# Altium PCB Flight_Computer_2_GE.PcbDoc (part 2 of 5)
Units mil, origin at the board's own origin, x right, y up, seen from the top; angles counter-clockwise.
Board outline 4000 x 3000 mil, 4 copper layers (Top Layer, GND, 3.3V, Bottom Layer), stack 62.449 mil thick; 220 components, 150 nets, 776 pads, 444 vias.
Unrouted connection lines stored in the file: 107.
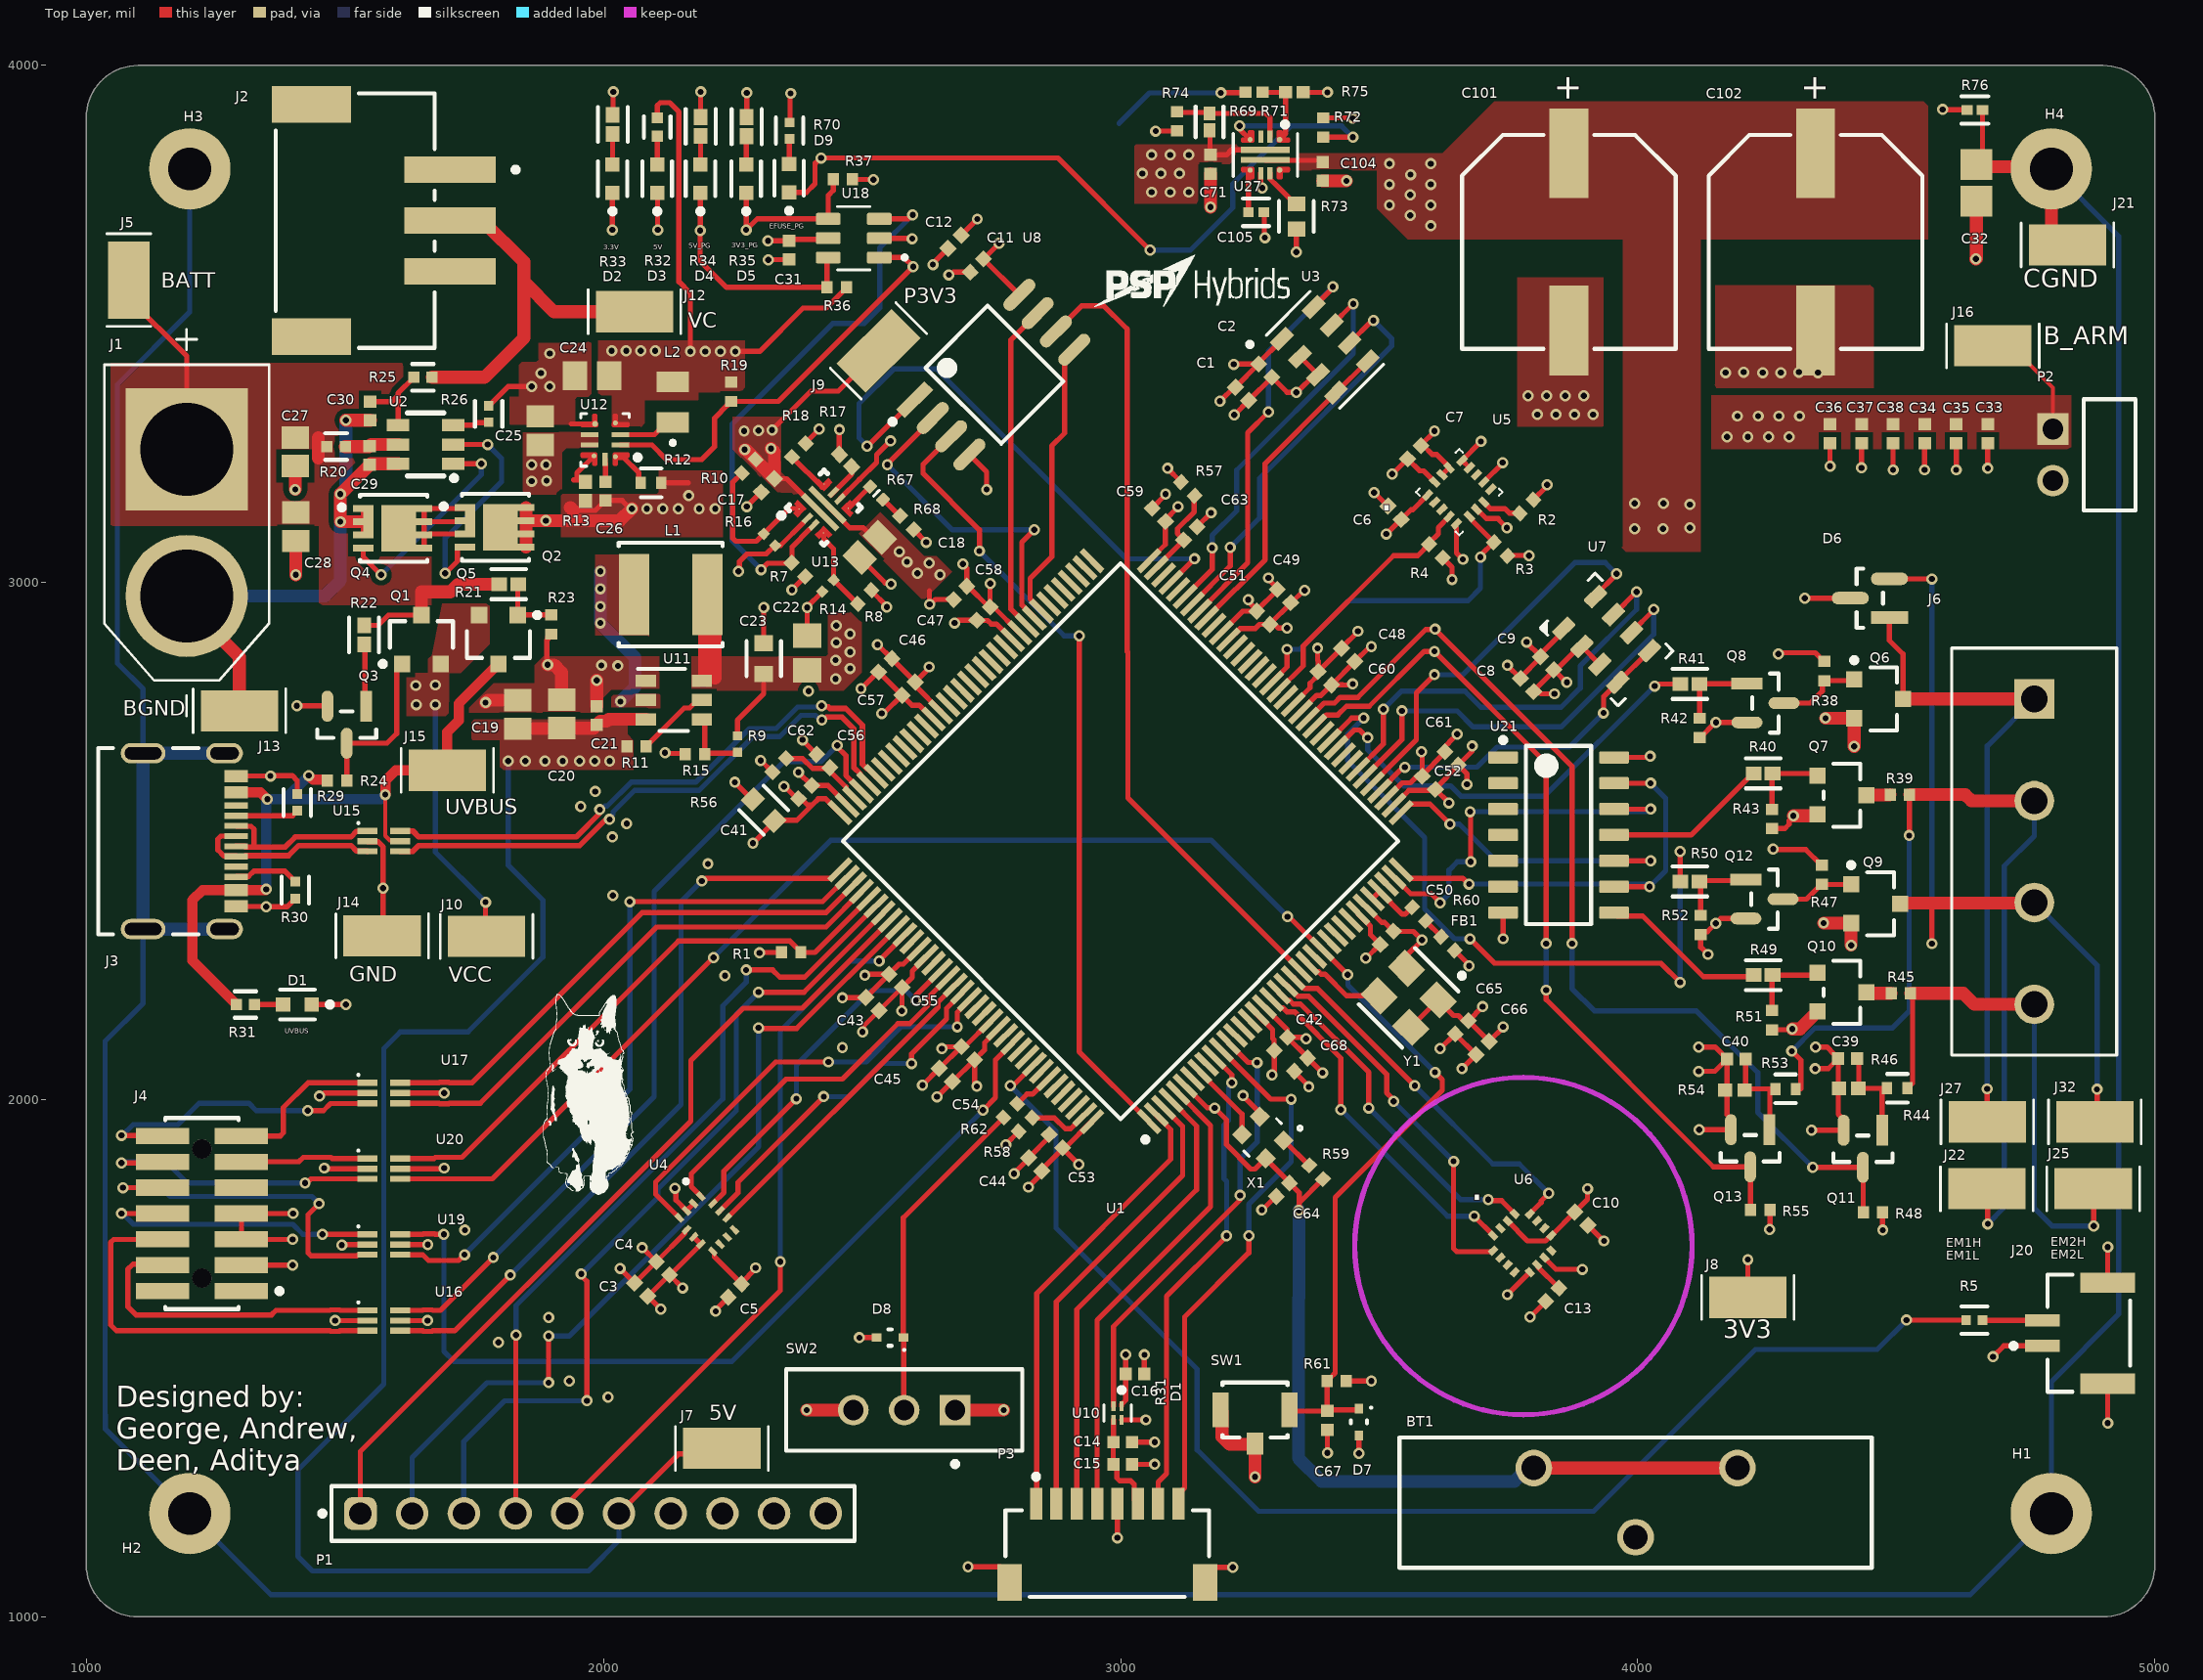
[diagram p0: Top Layer view]

## Part data (continued)
C23: library part CMP-03422-001204-1, "CAP CER 4.7UF 25V X5R 0603", Capacitance="4.7 uF", Manufacturer=YAGEO, Package=CC0603-DA, Temperature="-55°C to +125°C", Temperature Characteristic=X5R, Temperature Coefficient=15%, Temperature Range High=+125°C, Temperature Range Low=-55°C, Tolerance=0.2, Voltage="25 V", Automotive=No, Category=Cap, ComponentLink2Description=Datasheet, ComponentLink2URL=http://www.yageo.com/documents/recent/UPY-GPHC_X7R_6.3V-to-50V_18.pdf, Device Class L1="Passive Components", Device Class L2=Capacitors, Device Class L3="Ceramic Capacitors", Digikey Description="CAP CER 4.7UF 25V X5R 0603", Footprint Url=http://www.yageo.com/exep/pages/download/literatures/UPY-C_GEN_24.pdf, Height=0.9mm, Lead Free=Yes, Manufacturer Part Number=CC0603MRX5R8BB475, Material=Ceramic, Octopart=https://octopart.com/cc0603mrx5r8bb475-yageo-81932637, RoHS=TRUE, Voltage Rating="25 V"
C24: library part CMP-001-00007-7, Capacitor Type=Ceramic, Case/Package=0805, Max Operating Temperature=125°C, Min Operating Temperature=-55°C, Tolerance=10%, Voltage Rating=50V, Mounting Technology=SM, Pins=2, RoHS Compliant=True
C26: library part C_3.3nF_0402, "CAP CER 3300PF (3.3nF) 10V X7R 0402", Case Code (Imperial)=0402, Case Code (Metric)=1005, Dielectric=X7R, Dielectric Material=Ceramic, LCSC Part #=C20793063, Manufacturer="Samsung Electro-Mechanics", Manufacturer Part Number=CL05B332KA5VPNC, Max Operating Temperature=125°C, Min Operating Temperature=-55°C, Supplier Part Number=1276-CL05B332KA5VPNCCT-ND, Tolerance=10%, Voltage Rating=25V, Case/Package=0402, Category="Ceramic Capacitors", China RoHS=Compliant, ComponentLink1Description=https://datasheet.octopart.com:443/CL05B332KA5VPNC-Samsung-Electro-Mechanics-datasheet-176142735.pdf?src-supplier=IHS, ComponentLink1URL=https://datasheet.octopart.com:443/CL05B332KA5VPNC-Samsung-Electro-Mechanics-datasheet-176142735.pdf?src-supplier=IHS, ComponentLink2Description=https://datasheet.octopart.com:443/C0402C332M8RACTU-KEMET-datasheet-178445679.pdf?src-supplier=IHS, ComponentLink2URL=https://datasheet.octopart.com:443/C0402C332M8RACTU-KEMET-datasheet-178445679.pdf?src-supplier=IHS, ComponentLink3Description=https://datasheet.octopart.com:443/C0402C332M8RACTU-KEMET-datasheet-137357759.pdf?src-supplier=Upverter, ComponentLink3URL=https://datasheet.octopart.com:443/C0402C332M8RACTU-KEMET-datasheet-137357759.pdf?src-supplier=Upverter, ComponentLink4Description=https://datasheet.octopart.com:443/C0402C332M8RACTU-KEMET-datasheet-157246124.pdf?src-supplier=Electro+Sonic, ComponentLink4URL=https://datasheet.octopart.com:443/C0402C332M8RACTU-KEMET-datasheet-157246124.pdf?src-supplier=Electro+Sonic, ComponentLink5Description=https://datasheet.octopart.com/C0402C332M8RACTU-KEMET-datasheet-84169754.pdf, ComponentLink5URL=https://datasheet.octopart.com/C0402C332M8RACTU-KEMET-datasheet-84169754.pdf, Height=500µm, Length=1mm, Lifecycle Status=Production, Material=Ceramic, Mounting Technology="Surface Mount", Number of Terminals=2, Pins=2, Pricing="1=0.1, 10=0.034, 50=0.0226, 100=0.0193, 500=0.0138, 1000=0.01212, 2500=0.01034, 5000=0.00928 (USD)", REACH SVHC=Yes, RoHS=Compliant, Stock=24876, Supplier=DigiKey, Termination=SMD/SMT, Voltage Rating (DC)=25V, Weight=652.039032µg, Width=500µm
C32: library part CMP-2007-01230-1, "0805 1nF 1000V", Manufacturer=Kemet, Part Number=C0805C102JDRACTU
C33: library part CMP-001-00091-2, Capacitor Type=Ceramic, Case/Package=0402, LCSC Part Number=C307413, Manufacturer=Samsung, Manufacturer Part Number=CL05A105KL5NRNC, Max Operating Temperature=85°C, Min Operating Temperature=-55°C, Package Height=0.32mm, Package Length=1mm, Package Shape=Rectangular, Package Style=SMTMeter, Package Width=0.5mm, Power=62.5mW, Rated DC Voltage (URdc)=35V, Rated Temperature=70°C, Resistor Type="FIXED RESISTOR", Temperature Characteristics Code=X5R, Temperature Coefficient=100ppm/°C, Tolerance=1%, Tolerance  (fill in as +-)=10%, Working Voltage=50V, Additional Feature="LASER TRIMMABLE", Category="Ceramic Capacitors", Component Type=Standard, ComponentLink1Description=https://datasheet.ciiva.com:443/pdfs/VipMasterIC/IC/SEMS/SEMS-S-A0008384515/SEMS-S-A0008872905-1.pdf?src-supplier=IHS+Markit, ComponentLink1URL=https://datasheet.ciiva.com:443/pdfs/VipMasterIC/IC/SEMS/SEMS-S-A0008384515/SEMS-S-A0008872905-1.pdf?src-supplier=IHS+Markit, ComponentLink2Description=http://www.samsungsem.com/kr/support/product-search/mlcc/CL05A105KL5NRNC.jsp?src-supplier=Digikey, ComponentLink2URL=http://www.samsungsem.com/kr/support/product-search/mlcc/CL05A105KL5NRNC.jsp?src-supplier=Digikey, ComponentLink3Description=https://datasheet.octopart.com/CL05A105KL5NRNC-Samsung-datasheet-8326407.pdf?src-supplier=TME, ComponentLink3URL=https://datasheet.octopart.com/CL05A105KL5NRNC-Samsung-datasheet-8326407.pdf?src-supplier=TME, ComponentLink4Description=https://datasheet.ciiva.com:443/pdfs/VipMasterIC/IC/YAGO/YAGO-S-A0003597364/YAGO-S-A0003597364-1.pdf?src-supplier=IHS+Markit, ComponentLink4URL=https://datasheet.ciiva.com:443/pdfs/VipMasterIC/IC/YAGO/YAGO-S-A0003597364/YAGO-S-A0003597364-1.pdf?src-supplier=IHS+Markit, ComponentLink5Description=https://datasheet.ciiva.com/12656/pyu-ac-51-rohs-l-2-12656634.pdf?src-supplier=Mouser, ComponentLink5URL=https://datasheet.ciiva.com/12656/pyu-ac-51-rohs-l-2-12656634.pdf?src-supplier=Mouser, Construction=Chip, Design Item ID=CL05A105KL5NRNC, Dielectric Material=Ceramic, JESD-609 Code=e3, Mounting Technology="Surface Mount", Multilayer=Yes, Packaging="Tape and Reel", Pins=2, Pricing="1=0.31, 10=0.181, 50=0.1296, 100=0.1136, 500=0.08658, 1000=0.07816, 2500=0.06921, 5000=0.06379, 10000=0.0593, 20000=0.05558, 30000=0.0537, 50000=0.05162, 70000=0.0504, 100000=0.04922 (USD)", Reach SVHC Compliant=Yes, Reference Standard=AEC-Q200, RoHS=Yes, RoHS Compliant=Yes, Source=Hybrids_Avionics.SCHLIB, Stock=299048, Technology="METAL GLAZE/THICK FILM", Terminal Finish=Nickel, Termination=Wraparound, Tolerance (fill in as +-)=10%
C41: library part CMP-03422-001204-1, "CAP CER 4.7UF 10V X5R 0603", Capacitance="4.7 uF", Manufacturer=YAGEO, Manufacturer Part Number=CC0603MRX5R8BB475, Package=CC0603-DA, Temperature="-55°C to +125°C", Temperature Characteristic=X5R, Temperature Coefficient=15%, Temperature Range High=+125°C, Temperature Range Low=-55°C, Tolerance=0.2, Voltage="25 V", Automotive=No, Category=Cap, ComponentLink2Description=Datasheet, ComponentLink2URL=http://www.yageo.com/documents/recent/UPY-GPHC_X7R_6.3V-to-50V_18.pdf, Device Class L1="Passive Components", Device Class L2=Capacitors, Device Class L3="Ceramic Capacitors", Digikey Description="CAP CER 4.7UF 25V X5R 0603", Footprint Url=http://www.yageo.com/exep/pages/download/literatures/UPY-C_GEN_24.pdf, Height=0.9mm, Lead Free=Yes, Material=Ceramic, Octopart=https://octopart.com/cc0603mrx5r8bb475-yageo-81932637, RoHS=TRUE, Voltage Rating="25 V"
C52: library part C_4.7uF_0402, "CAP CER 4.7UF 16V X5R 0402", Capacitor Type=Ceramic, Case/Package=0402, LCSC Part #=C318563, Manufacturer=Samsung, Manufacturer Part Number=CL05A475MO5NUNC, Max Operating Temperature=85°C, Min Operating Temperature=-55°C, Package Shape=Rectangular, Package Style=SMTMeter, Rated DC Voltage (URdc)=16V, Supplier Part Number=1276-6836-1-ND, Temperature Characteristics Code=X5R, Tolerance  (fill in as +-)=20%, Category="Ceramic Capacitors", ComponentLink1Description=https://datasheet.ciiva.com:443/pdfs/VipMasterIC/IC/SEMS/SEMS-S-A0008384515/SEMS-S-A0008898881-1.pdf?src-supplier=IHS+Markit, ComponentLink1URL=https://datasheet.ciiva.com:443/pdfs/VipMasterIC/IC/SEMS/SEMS-S-A0008384515/SEMS-S-A0008898881-1.pdf?src-supplier=IHS+Markit, ComponentLink2Description=http://www.farnell.com/datasheets/2710653.pdf?src-supplier=Farnell, ComponentLink2URL=http://www.farnell.com/datasheets/2710653.pdf?src-supplier=Farnell, ComponentLink3Description=http://www.samsungsem.com/kr/support/product-search/mlcc/CL05A475MO5NUNC.jsp?src-supplier=Digikey, ComponentLink3URL=http://www.samsungsem.com/kr/support/product-search/mlcc/CL05A475MO5NUNC.jsp?src-supplier=Digikey, ComponentLink4Description=http://www.farnell.com/datasheets/2710653.pdf?src-supplier=Newark, ComponentLink4URL=http://www.farnell.com/datasheets/2710653.pdf?src-supplier=Newark, ComponentLink5Description=http://www.farnell.com/datasheets/2710653.pdf?src-supplier=Element14, ComponentLink5URL=http://www.farnell.com/datasheets/2710653.pdf?src-supplier=Element14, ComponentLink6Description=https://datasheet.octopart.com/CL05A475MO5NUNC-Samsung-Electro-Mechanics-datasheet-123102911.pdf?src-supplier=Future+Electronics, ComponentLink6URL=https://datasheet.octopart.com/CL05A475MO5NUNC-Samsung-Electro-Mechanics-datasheet-123102911.pdf?src-supplier=Future+Electronics, Dielectric Material=Ceramic, Height=0.7mm, JESD-609 Code=e3, Length=1mm, Mounting Technology="Surface Mount", Multilayer=Yes, Packaging="Tape and Reel", Pins=2, Pricing="1=0.43, 10=0.252, 50=0.1826, 100=0.161, 500=0.12446, 1000=0.11305, 2500=0.10094, 5000=0.0936, 10000=0.08752, 20000=0.08248, 30000=0.07994, 50000=0.07712, 70000=0.07547, 100000=0.07387 (USD)", Reach SVHC Compliant=Yes, RoHS=Yes, RoHS Compliant=Yes, Stock=200989, Supplier=Digikey, Terminal Finish=Nickel, Termination=Wraparound, Tolerance (fill in as +-)=20%, Width=0.5mm
C62 C63: library part C_2.2uF_0402_1, "Ceramic Capacitor, Ceramic, 25V, 20% +Tol, 20% -Tol, X5R, 15% TC, 2.2uF, Surface Mount, 0402", Case Code (Imperial)=0402, Case Code (Metric)=1005, Dielectric=C0G, Dielectric Material=Ceramic, Insulation Resistance=10GΩ, LCSC Part #=C723363, Manufacturer="Yageo Group", Manufacturer Part Number=CC0402MRX5R8BB225, Max Operating Temperature=125°C, Min Operating Temperature=-55°C, Supplier Part Number=13-CC0402MRX5R8BB225CT-ND, Supplier Part Number 1=13-CC0402KRX5R8BB225CT-ND, Temperature Coefficient=30ppm/°C, Voltage Rating=50V, Case/Package=0402, Category="Ceramic Capacitors", China RoHS=Compliant, ComponentLink1Description=https://datasheet.octopart.com:443/CC0402CRNPO9BN2R7-Yageo-datasheet-182140217.pdf?src-supplier=IHS, ComponentLink1URL=https://datasheet.octopart.com:443/CC0402CRNPO9BN2R7-Yageo-datasheet-182140217.pdf?src-supplier=IHS, ComponentLink2Description=https://datasheet.octopart.com:443/CC0402CRNPO9BN2R7-Yageo-datasheet-151948684.pdf?src-supplier=Farnell, ComponentLink2URL=https://datasheet.octopart.com:443/CC0402CRNPO9BN2R7-Yageo-datasheet-151948684.pdf?src-supplier=Farnell, ComponentLink3Description=https://datasheet.octopart.com:443/CC0402CRNPO9BN2R7-Yageo-datasheet-181966735.pdf?src-supplier=Farnell, ComponentLink3URL=https://datasheet.octopart.com:443/CC0402CRNPO9BN2R7-Yageo-datasheet-181966735.pdf?src-supplier=Farnell, ComponentLink4Description=https://datasheet.octopart.com:443/CC0402CRNPO9BN2R7-Yageo-datasheet-137875056.pdf?src-supplier=Future+Electronics, ComponentLink4URL=https://datasheet.octopart.com:443/CC0402CRNPO9BN2R7-Yageo-datasheet-137875056.pdf?src-supplier=Future+Electronics, ComponentLink5Description=https://datasheet.octopart.com:443/CC0402CRNPO9BN2R7-Yageo-datasheet-136957424.pdf?src-supplier=Future+Electronics, ComponentLink5URL=https://datasheet.octopart.com:443/CC0402CRNPO9BN2R7-Yageo-datasheet-136957424.pdf?src-supplier=Future+Electronics, ComponentLink6Description=https://datasheet.octopart.com:443/CC0402CRNPO9BN2R7-Yageo-datasheet-137700082.pdf?src-supplier=Future+Electronics, ComponentLink6URL=https://datasheet.octopart.com:443/CC0402CRNPO9BN2R7-Yageo-datasheet-137700082.pdf?src-supplier=Future+Electronics, ComponentLink7Description=https://datasheet.octopart.com:443/CC0402CRNPO9BN2R7-Yageo-datasheet-78855684.pdf?src-supplier=Future+Electronics, ComponentLink7URL=https://datasheet.octopart.com:443/CC0402CRNPO9BN2R7-Yageo-datasheet-78855684.pdf?src-supplier=Future+Electronics, ComponentLink8Description=https://datasheet.octopart.com:443/CC0402CRNPO9BN2R7-Yageo-datasheet-24578986.pdf?src-supplier=Future+Electronics, ComponentLink8URL=https://datasheet.octopart.com:443/CC0402CRNPO9BN2R7-Yageo-datasheet-24578986.pdf?src-supplier=Future+Electronics, ComponentLink9Description=https://datasheet.octopart.com:443/CC0402CRNPO9BN2R7-Yageo-datasheet-16730043.pdf?src-supplier=Future+Electronics, ComponentLink9URL=https://datasheet.octopart.com:443/CC0402CRNPO9BN2R7-Yageo-datasheet-16730043.pdf?src-supplier=Future+Electronics, ComponentLink10Description=https://datasheet.octopart.com:443/CC0402CRNPO9BN2R7-Yageo-datasheet-12589826.pdf?src-supplier=Future+Electronics, ComponentLink10URL=https://datasheet.octopart.com:443/CC0402CRNPO9BN2R7-Yageo-datasheet-12589826.pdf?src-supplier=Future+Electronics, ComponentLink11Description=https://datasheet.octopart.com:443/CC0402CRNPO9BN2R7-Yageo-datasheet-10406438.pdf?src-supplier=Newark, ComponentLink11URL=https://datasheet.octopart.com:443/CC0402CRNPO9BN2R7-Yageo-datasheet-10406438.pdf?src-supplier=Newark, ComponentLink12Description=https://datasheet.octopart.com:443/CC0402CRNPO9BN2R7-Yageo-datasheet-65873193.pdf?src-supplier=Newark, ComponentLink12URL=https://datasheet.octopart.com:443/CC0402CRNPO9BN2R7-Yageo-datasheet-65873193.pdf?src-supplier=Newark, ComponentLink13Description=https://datasheet.octopart.com:443/CC0402CRNPO9BN2R7-Yageo-datasheet-68296204.pdf?src-supplier=Megastar, ComponentLink13URL=https://datasheet.octopart.com:443/CC0402CRNPO9BN2R7-Yageo-datasheet-68296204.pdf?src-supplier=Megastar, ComponentLink14Description=http://sigma.octopart.com:80/rohs_statement/Yageo-company-2.pdf?src-supplier=Compliance+Statements, ComponentLink14URL=http://sigma.octopart.com:80/rohs_statement/Yageo-company-2.pdf?src-supplier=Compliance+Statements, ComponentLink15Description=http://sigma.octopart.com:80/conflict_mineral_statement/Yageo-company-3.pdf?src-supplier=Compliance+Statements, ComponentLink15URL=http://sigma.octopart.com:80/conflict_mineral_statement/Yageo-company-3.pdf?src-supplier=Compliance+Statements, ComponentLink16Description=https://datasheet.octopart.com:443/CC0402MRX5R8BB225-Yageo-datasheet-170350636.pdf?src-supplier=IHS, ComponentLink16URL=https://datasheet.octopart.com:443/CC0402MRX5R8BB225-Yageo-datasheet-170350636.pdf?src-supplier=IHS, ComponentLink17Description=https://datasheet.octopart.com:443/CC0402MRX5R8BB225-Yageo-datasheet-78855684.pdf?src-supplier=Upverter, ComponentLink17URL=https://datasheet.octopart.com:443/CC0402MRX5R8BB225-Yageo-datasheet-78855684.pdf?src-supplier=Upverter, ComponentLink18Description=https://datasheet.octopart.com:443/CC0402MRX5R8BB225-Yageo-datasheet-181967557.pdf?src-supplier=Farnell, ComponentLink18URL=https://datasheet.octopart.com:443/CC0402MRX5R8BB225-Yageo-datasheet-181967557.pdf?src-supplier=Farnell, ComponentLink19Description=https://datasheet.octopart.com:443/CC0402MRX5R8BB225-Yageo-datasheet-181967556.pdf?src-supplier=Farnell, ComponentLink19URL=https://datasheet.octopart.com:443/CC0402MRX5R8BB225-Yageo-datasheet-181967556.pdf?src-supplier=Farnell, ComponentLink20Description=https://datasheet.octopart.com:443/CC0402MRX5R8BB225-Yageo-datasheet-145016144.pdf?src-supplier=ODG+(Origin+Data+Global), ComponentLink20URL=https://datasheet.octopart.com:443/CC0402MRX5R8BB225-Yageo-datasheet-145016144.pdf?src-supplier=ODG+(Origin+Data+Global), ComponentLink21Description=https://datasheet.octopart.com/CC0402MRX5R8BB225-Yageo-datasheet-86397281.pdf, ComponentLink21URL=https://datasheet.octopart.com/CC0402MRX5R8BB225-Yageo-datasheet-86397281.pdf, Composition=Ceramic, Depth=500µm, Halogen Free="Halogen Free", Height=500µm, Lead Free="Lead Free", Length=1mm, Lifecycle Status=Production, Material=Ceramic, Mounting Technology="Surface Mount", Number of Terminals=2, Packaging="Tape & Reel (TR)", Pins=2, Pricing="1=0.3, 10=0.176, 50=0.1282, 100=0.1135, 500=0.08336, 1000=0.08124, 2500=0.07321, 5000=0.06838 (USD)", Radiation Hardening=No, REACH SVHC=Yes, RoHS=Compliant, Schedule B="8532240020, 8532240020|8532240020|8532240020|8532240020|8532240020", Stock=20337, Supplier=DigiKey, Supplier 1=DigiKey, Termination=SMD/SMT, Thickness=558.8µm, Voltage Rating (DC)=50V, Weight=652.039032µg, Width=500µm
C101 C102: library part CMP-03913-53914671-2, "CAPACITOR, 470UF, 10VDC, ALUM ELECT, SMD; Available until stocks are exhausted", Capacitance=470µF, Case/Package=Radial, Insulation Resistance=212.766kΩ, Leakage Current=47µA, Max Operating Temperature=105°C, Min Operating Temperature=-40°C, Ripple Current=280mA, Tolerance=20%, Voltage Rating=10V, Diameter=10mm, Height=10.5mm, Height - Seated (Max)=10.4902mm, Length=10.5mm, Life (Hours)=5000hours, Mount="Surface Mount", Polarity=Polar, REACH SVHC=Unknown, Ripple Current (AC)=280mA, RoHS=Compliant, Voltage Rating (DC)=10V, Width=10.3mm
C105: library part CMP-13271-000751-1, "Cap Ceramic 10nF 50V X7R ±10% SMD 0402 +125°C Paper T/R", Case/Package=0402, Dielectric=X7R, Max Operating Temperature=125°C, Min Operating Temperature=-55°C, Package Quantity=50000, Tolerance=10%, Voltage=50V, Capacitance=10nF, Depth=0.5mm, Height=0.5mm, Length=1mm, Mount="Surface Mount", Packaging="Tape and Reel", Radiation Hardening=No, Thickness=0.022inch, Voltage Rating=50V, Voltage Rating (DC)=50V, Width=0.02inch
D1 D2 D3 D4 D5 D9: library part CMP-00731-94024739-1, "LSM0603453V LED SM 0603 3V -/1000/-mcd Green", Case/Package=0603, Color=Green, Forward Current=20mA, Forward Voltage=2.3V, Max Operating Temperature=85°C, Min Operating Temperature=-40°C, Power Dissipation=60mW, Reverse Voltage=5V, Height=550µm, Luminous Intensity=120mcd, NexarPartId=94024739, Schedule B="8541402000, 8541406050", Viewing Angle=120°, Wavelength=576nm
D6: library part CMP-1055-00550-2, "DIODE ARRAY SCHOTTKY 30V SOT23-3", Average Rectified Current=200mA, Capacitance=10pF, Case/Package=SOT-23-3, Current Rating=10A, Forward Voltage=800mV, Max Forward Surge Current (Ifsm)=600mA, Max Operating Temperature=150°C, Max Power Dissipation=225mW, Max Repetitive Reverse Voltage (Vrrm)=30V, Max Reverse Leakage Current=2uA, Min Operating Temperature=-55°C, Package Quantity=3000, Contact Plating=Tin, Element Configuration="Common Anode", Forward Current=200mA, Halogen Free="Halogen Free", Height=0.04inch, Lead Free="Lead Free", Length=0.119inch, Max Reverse Voltage (DC)=30V, Max Surge Current=600mA, Number of Pins=3, Packaging="Tape and Reel", Peak Non-Repetitive Surge Current=600mA, Peak Reverse Current=2uA, Power Dissipation=225mW, Radiation Hardening=No, REACH SVHC="No SVHC", Recovery Time=5ns, Reverse Recovery Time=5ns, Termination=SMD/SMT, Voltage Rating (DC)=30V, Width=0.055inch
D7 D8: library part CMP-1063-00098-1, "Transient Voltage Suppressor, Micro-Packaged Diode for ESD Protection, 2-Pin SOD-523, Pb-Free, Tape and Reel", Manufacturer="On Semiconductor", ComponentLink1Description="Manufacturer URL", ComponentLink1URL=http://www.onsemi.com/, ComponentLink2Description=Datasheet, ComponentLink2URL=http://www.onsemi.cn/pub_link/Collateral/ESD5Z2.5T1-D.PDF, ComponentLink3Description="Package Specification", ComponentLink3URL=http://www.onsemi.com/pub_link/Collateral/502-01.PDF, DatasheetVersion="Rev. 10", Direction=Unidirectional, IR Max (uA)=0.05, Mounting Technology="Surface Mount", Number of Lines=1, PackageDescription="2-Pin SOD, Body 1.2 x 0.8 mm", PackageReference=SOD-523-2-502-01, PackageVersion="Rev. E, 09/2010", Packing="Tape and Reel", PartNumber=ESD5Z3.3T1G, PPK Max (W)=158, RoHS=Pb-Free, V(BR) Min (V)=5, VRWM Max (V)=3.3